# Altium PCB PWB.PcbDoc (part 2 of 5)
Units mm, origin at the board's own origin, x right, y up, seen from the top; angles counter-clockwise.
Board outline 202 x 125 mm, 2 copper layers (Top Layer, Bottom Layer), stack 1.576 mm thick; 208 components, 124 nets, 630 pads, 5440 vias.
Unrouted connection lines stored in the file: 98.
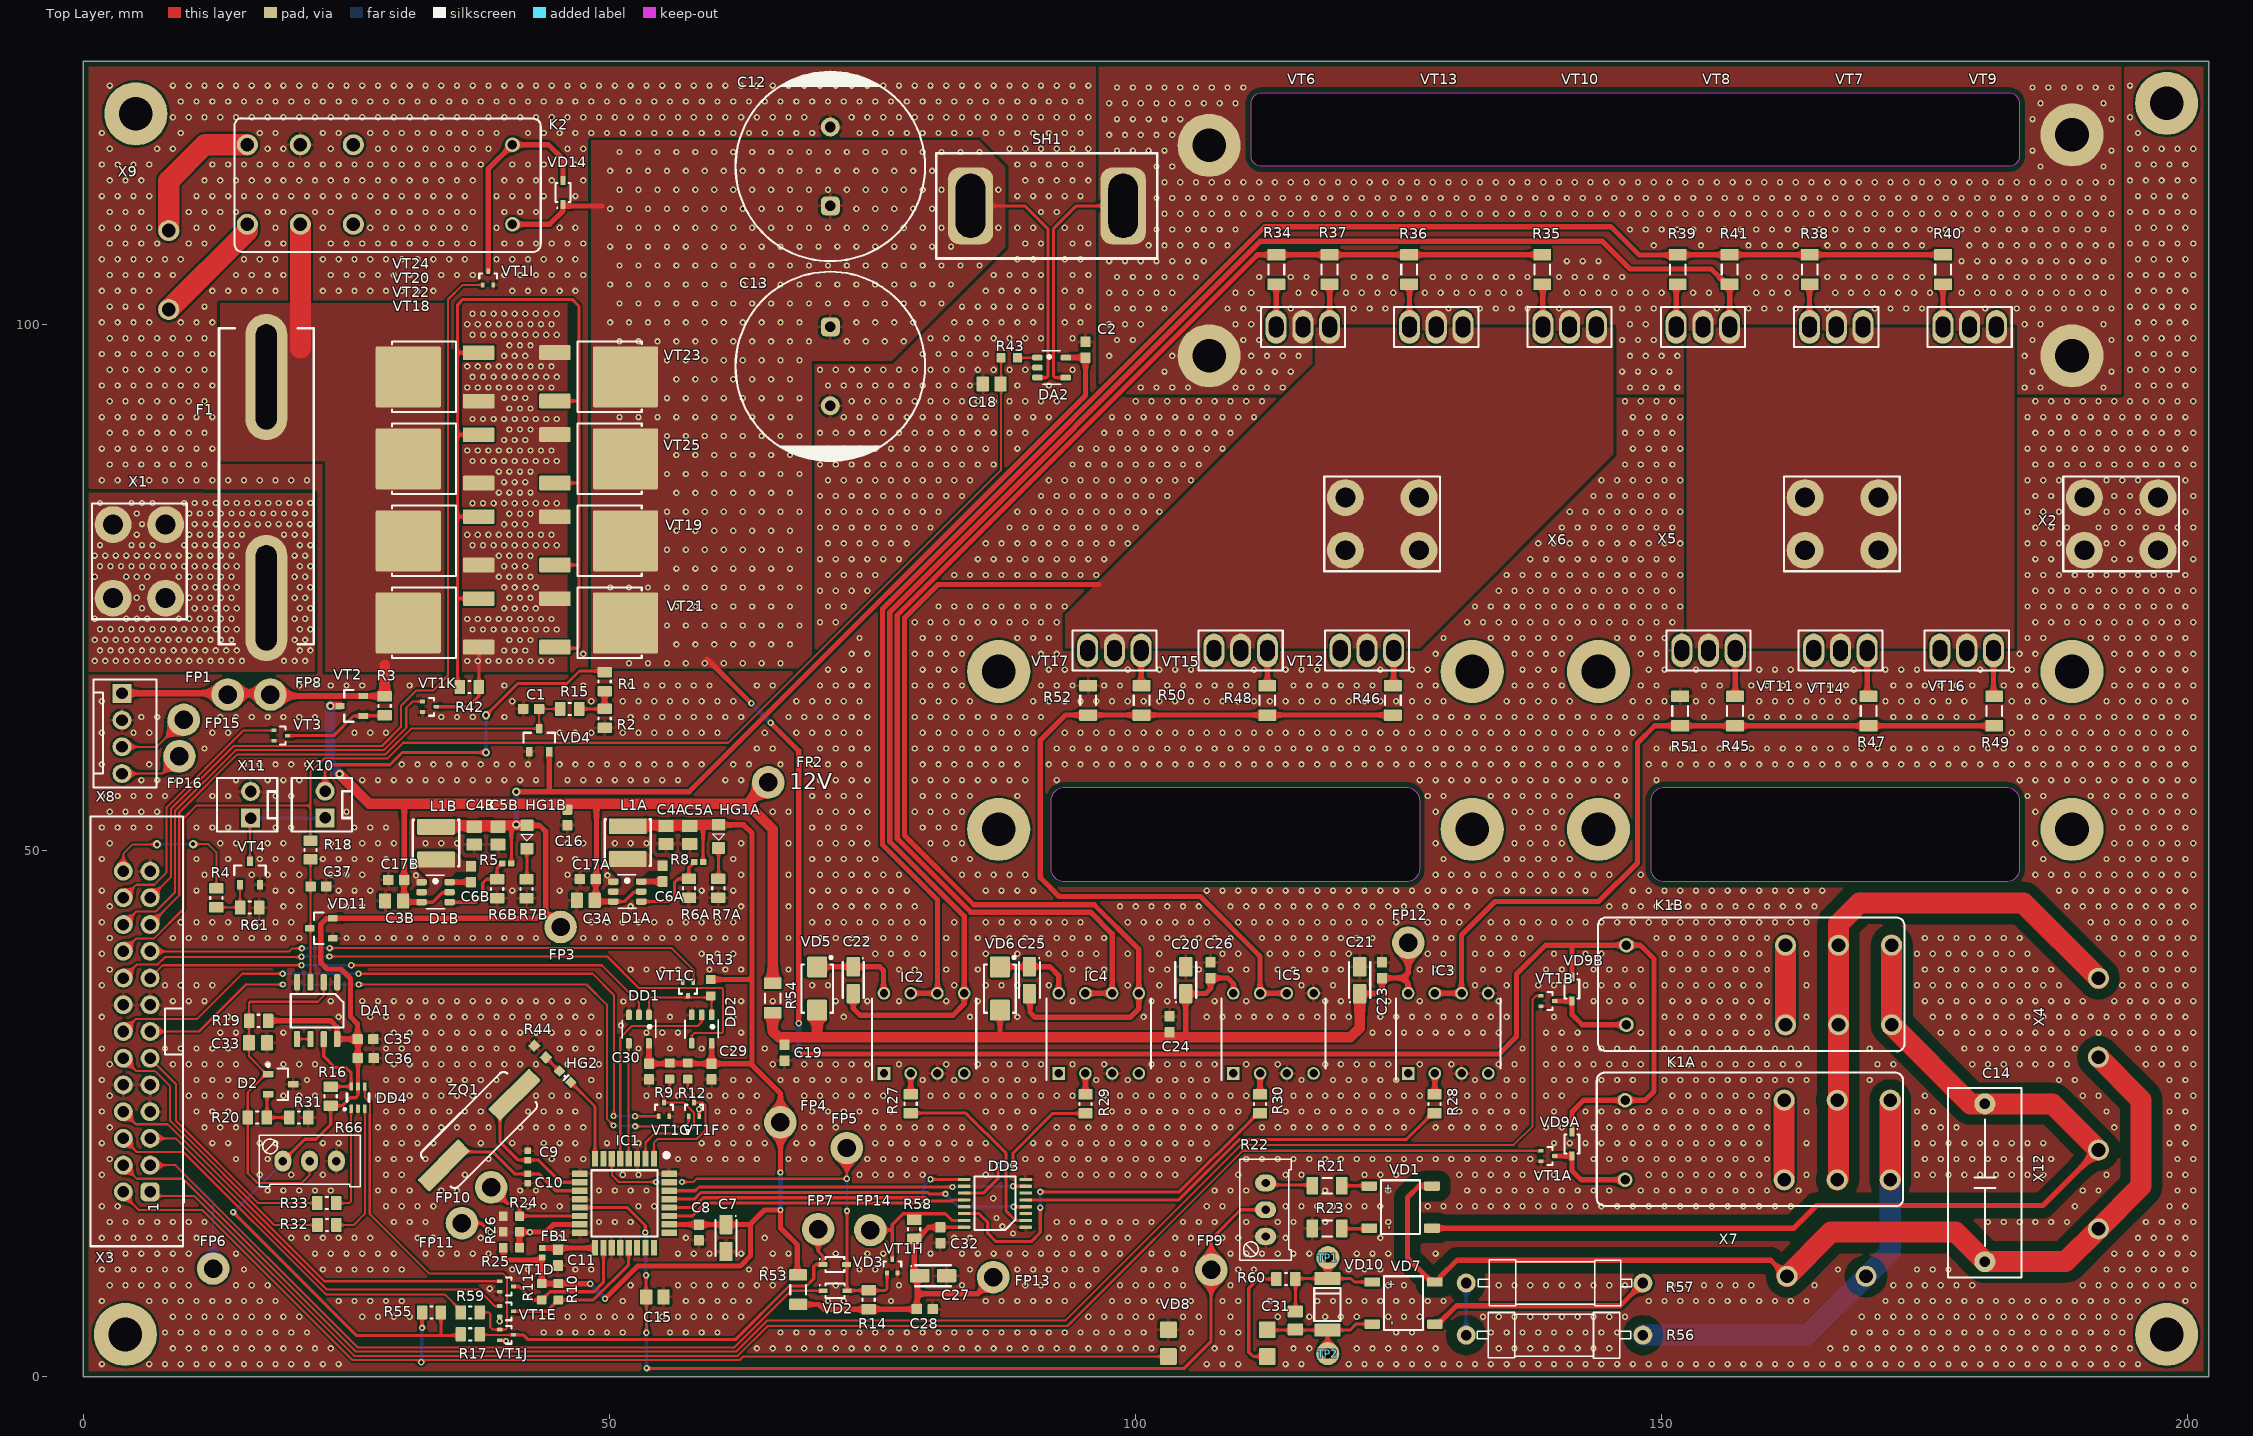
[diagram p0: Top Layer view]

## Part data (continued)
R4 R27 R28 R29 R30: library part CRCW0805510RJNEA, "510 Ohms ±5%, 1/8W 0805 Thick Film Resistor", Manufacturer=Vishay, Package=0805, Power Rating=0.125W, Supplier Part Number 1=71-CRCW0805510RJNEA, Temperature Range="-55°C ~ 155°C", Temperature Stability=±200ppm/°C, Tolerance=±5%, Voltage=150V, Ajax_1C_ID=9454, Ajax_1C_PN="510R 5% 0805 Resistors SMD RoHS", Ajax_1С_Status="RND Only", Component Status=Released, Component Type=SMD, ComponentLink1Description=Datasheet, ComponentLink1URL=https://eu.mouser.com/datasheet/2/427/dcrcwe3-1762152.pdf, GUID_1C=51b8dd24-e3a6-11e6-82a2-d8cb8a9acc66, Part Number=CRCW0805510RJNEA, Part Type="Thick Film", Price=0,09, Replacement=NONE, Supplier 1=Mouser
R5: library part RC0402FR-0731K6L, "31.6 kOhms ±1% 1/16W 0402 Thick Film Resistor", Manufacturer=Yageo, Package=0402, Power Rating=0.062W, Supplier Part Number 1=603-RC0402FR-0731K6L, Temperature Range="-55°C ~ 155°C", Temperature Stability=±100ppm/°C, Tolerance=±1%, Voltage=50V, Ajax_1C_ID=42440, Ajax_1C_PN="31.6k 1% 0402 Resistors SMD RoHS", Ajax_1С_Status="RND Only", Component Status=Released, Component Type=SMD, ComponentLink1Description=Datasheet, ComponentLink1URL=https://eu.mouser.com/datasheet/2/447/PYu_RC_Group_51_RoHS_L_11-1984063.pdf, GUID_1C=e9ef95d9-cab3-11ec-a360-005056994834, Part Number=RC0402FR-0731K6L, Part Type="Thick Film", Price=0,013, Replacement=NONE, Supplier 1=Mouser
R7A R7B: library part ERJ-P06F5100V, "510 Ohms ±1%, 1/2W 0805 High Power Thick Film Resistor", Manufacturer=Panasonic, Package=0805, Power Rating=0.5W, Supplier Part Number 1=667-ERJ-P06F5100V, Temperature Range="-55°C ~ 155°C", Temperature Stability=±100ppm/°C, Tolerance=±1%, Voltage=400V, Ajax_1C_ID=15765, Ajax_1C_PN="510R 1% 0.5W 0805 Panasonic ERJ-P06F5100V Resistors SMD RoHS", Ajax_1С_Status="RND Only", Component Status=Released, Component Type=SMD, ComponentLink1Description=Datasheet, ComponentLink1URL=https://eu.mouser.com/datasheet/2/315/AOA0000C331-1141874.pdf, GUID_1C=3592f296-62b5-11e9-ab4f-0050569f2651, Part Number=ERJ-P06F5100V, Part Type="Thick Film / Anti-Surge/Pulse Withstanding", Price=0,036096, Replacement=NONE, Supplier 1=Mouser
R8: library part RC0402FR-0756K2L, "56.2 kOhms ±1% 1/16W 0402 Thick Film Resistor", Manufacturer=Yageo, Package=0402, Power Rating=0.062W, Supplier Part Number 1=YAG3187TR-ND, Temperature Range="-55°C ~ 155°C", Temperature Stability=±100ppm/°C, Tolerance=±1%, Voltage=50V, Ajax_1C_ID=20241, Ajax_1C_PN="56.2k 1% 0402 Resistors SMD RoHS", Ajax_1С_Status="Mass Production", Component Status=Released, Component Type=SMD, ComponentLink1Description=Datasheet, ComponentLink1URL=https://eu.mouser.com/datasheet/2/447/PYu_RC_Group_51_RoHS_L_11-1984063.pdf, GUID_1C=73881b35-8945-11ea-ab60-0050569f2651, Part Number=RC0402FR-0756K2L, Part Type="Thick Film", Price=0,00065, Replacement=NONE, Supplier 1=Digi-Key
R9 R10 R11 R12 R13 R43: library part RC0603JR-0710KL, "10 kOhms ±5%, 1/10W 0603 Thick Film Resistor", Manufacturer=Yageo, Package=0603, Power Rating=0.1W, Supplier Part Number 1=311-10KGRTR-ND, Temperature Range="-55°C ~ 155°C", Temperature Stability=±100ppm/°C, Tolerance=±5%, Voltage=75V, Ajax_1C_ID=2860, Ajax_1C_PN="10k 5% 0603 Resistors SMD RoHS", Ajax_1С_Status="Mass Production", Component Status=Released, Component Type=SMD, ComponentLink1Description=Datasheet, ComponentLink1URL=https://eu.mouser.com/datasheet/2/447/PYu_RC_Group_51_RoHS_L_10-1664068.pdf, GUID_1C=df4c2852-e567-11e2-9779-6c626deda1bb, Part Number=RC0603JR-0710KL, Part Type="Thick Film", Price=0,0006, Replacement=NONE, Supplier 1=Digi-Key
R14 R16 R17: library part RC0805JR-073K3L, "3.3 kOhms ±5%, 1/8W 0805 Thick Film Resistor", Manufacturer=Yageo, Package=0805, Power Rating=0.125W, Temperature Range="-55°C ~ 155°C", Temperature Stability=±100ppm/°C, Tolerance=±5%, Voltage=150V, Ajax_1C_ID=9030, Ajax_1C_PN="3.3k 5% 0805 Resistors SMD RoHS", Ajax_1С_Status="RND Only", Component Status=Released, Component Type=SMD, ComponentLink1Description=Datasheet, ComponentLink1URL=https://eu.mouser.com/datasheet/2/447/PYu_RC_Group_51_RoHS_L_10-1664068.pdf, GUID_1C=cb9785ec-9b47-11e6-8242-d8cb8a9acc66, Part Number=RC0805JR-073K3L, Part Type="Thick Film", Price=0,001081, Replacement=NONE
R15: library part RC0805JR-071KL, "1 kOhms ±5%, 1/8W 0805 Thick Film Resistor", Manufacturer=Yageo, Package=0805, Power Rating=0.125W, Supplier Part Number 1=311-1.0KARTR-ND, Temperature Range="-55°C ~ 155°C", Temperature Stability=±100ppm/°C, Tolerance=±5%, Voltage=150V, Ajax_1C_PN=NONE, Ajax_1С_Status="RND Only", Component Status=Released, Component Type=SMD, ComponentLink1Description=Datasheet, ComponentLink1URL=https://eu.mouser.com/datasheet/2/447/PYu_RC_Group_51_RoHS_L_11-1984063.pdf, Part Number=RC0805JR-071KL, Part Type="Thick Film", Price=NONE, Replacement=NONE, Supplier 1=Digi-Key
R18 R55: library part RC0805FR-0710K2L, "10.2 kOhms ±1%, 1/8W 0805 Thick Film Resistor", Manufacturer=Yageo, Package=0805, Power Rating=0.125W, Supplier Part Number 1=311-10.2KCRTR-ND, Temperature Range="-55°C ~ 155°C", Temperature Stability=±100ppm/°C, Tolerance=±1%, Voltage=150V, Ajax_1C_ID=13943, Ajax_1C_PN="10.2k 1% 0805 Resistors SMD RoHS", Ajax_1С_Status="Mass Production", Component Status=Released, Component Type=SMD, ComponentLink1Description=Datasheet, ComponentLink1URL=https://eu.mouser.com/datasheet/2/447/PYu_RC_Group_51_RoHS_L_10-1664068.pdf, GUID_1C=8bc9d0ce-c58a-11e8-ab47-0050569f2651, Part Number=RC0805FR-0710K2L, Part Type="Thick Film", Price=0,0014, Replacement=NONE, Supplier 1=Digi-Key
R19 R32 R33 R59: library part RC0805JR-073K3L, "3.3 kOhms ±5%, 1/8W 0805 Thick Film Resistor", Manufacturer=Yageo, Package=0805, Part Number=RC0805JR-07100, Power Rating=0.125W, Temperature Range="-55°C ~ 155°C", Temperature Stability=±100ppm/°C, Tolerance=±1%, Voltage=150V, Ajax_1C_ID=9030, Ajax_1C_PN="100 5% 0805 Resistors SMD RoHS", Ajax_1С_Status="RND Only", Component Status=Released, Component Type=SMD, ComponentLink1Description=Datasheet, ComponentLink1URL=https://eu.mouser.com/datasheet/2/447/PYu_RC_Group_51_RoHS_L_10-1664068.pdf, GUID_1C=cb9785ec-9b47-11e6-8242-d8cb8a9acc66, Part Type="Thick Film", Price=0,001081, Replacement=NONE
R20: library part CRCW0805510RJNEA, "510 Ohms ±5%, 1/8W 0805 Thick Film Resistor", Manufacturer=Vishay, Package=0805, Power Rating=0.125W, Supplier Part Number 1=71-CRCW0805510RJNEA, Temperature Range="-55°C ~ 155°C", Temperature Stability=±200ppm/°C, Tolerance=±1%, Voltage=150V, Ajax_1C_ID=9454, Ajax_1C_PN="510R 5% 0805 Resistors SMD RoHS", Ajax_1С_Status="RND Only", Component Status=Released, Component Type=SMD, ComponentLink1Description=Datasheet, ComponentLink1URL=https://eu.mouser.com/datasheet/2/427/dcrcwe3-1762152.pdf, GUID_1C=51b8dd24-e3a6-11e6-82a2-d8cb8a9acc66, Part Number=CRCW0805510RJNEA, Part Type="Thick Film", Price=0,09, Replacement=NONE, Supplier 1=Mouser
R21 R23: library part RC1206FR-07100KL, "100 kOhms ±1%, 1/4W 1206 Thick Film Resistor", Manufacturer=Yageo, Package=1206, Power Rating=0.25W, Supplier Part Number 1=311-100KFRTR-ND, Temperature Range="-55°C ~ 155°C", Temperature Stability=±100ppm/°C, Tolerance=±1%, Voltage=200V, Ajax_1C_ID=14373, Ajax_1C_PN="100k 1% 1206 Resistors SMD RoHS", Ajax_1С_Status="Mass Production", Component Status=Released, Component Type=SMD, ComponentLink1Description=Datasheet, ComponentLink1URL=https://eu.mouser.com/datasheet/2/447/PYu_RC_Group_51_RoHS_L_10-1664068.pdf, GUID_1C=93b23056-f3fc-11e8-ab4c-0050569f2651, Part Number=RC1206FR-07100KL, Part Type="Thick Film", Price=0,00288, Replacement=NONE, Supplier 1=Digi-Key
R22 R66: library part 3296W-1-103LF, "10 kOhms ±10% Trimmer Resistor, 0.5W, Through Hole 3/8\", 4.83x9.53mm, 10.03mm Height", Manufacturer=Bourns, Package=4.83x9.53mm, Power Rating=0.5W, Supplier Part Number 1=652-3296W-1-103LF, Temperature Range="-55°C ~ 125°C", Temperature Stability=±100ppm/°C, Tolerance=±10%, Ajax_1C_PN=NONE, Ajax_1С_Status="RND Only", Component Status="On Review", Component Type=PTH, ComponentLink1Description=Datasheet, ComponentLink1URL=https://www.bourns.com/data/global/pdfs/3296.pdf, Part Number=3296W-1-103LF, Part Type="Trimming Potentiometer", Price=NONE, Replacement=NONE, Supplier 1=Mouser
R24 R25 R26: library part RC0603JR-070RL, "0 Ohms Jumper, 1/10W 0603 Thick Film Resistor", Manufacturer=Yageo, Package=0603, Power Rating=0.1W, Supplier Part Number 1=311-0.0GRTR-ND, Temperature Range="-55°C ~ 155°C", Temperature Stability=NONE, Tolerance=±5%, Voltage=75V, Ajax_1C_ID=2857, Ajax_1C_PN="0R 5% 0603 Resistors SMD RoHS", Ajax_1С_Status="Mass Production", Component Status=Released, Component Type=SMD, ComponentLink1Description=Datasheet, ComponentLink1URL=https://eu.mouser.com/datasheet/2/447/PYu_RC_Group_51_RoHS_L_10-1664068.pdf, GUID_1C=df4c284c-e567-11e2-9779-6c626deda1bb, Part Number=RC0603JR-070RL, Part Type="Thick Film", Price=0,0006, Replacement=NONE, Supplier 1=Digi-Key